# Allegro board T527-REF-LPDDR4-32X1-S4L-V1-0.brd
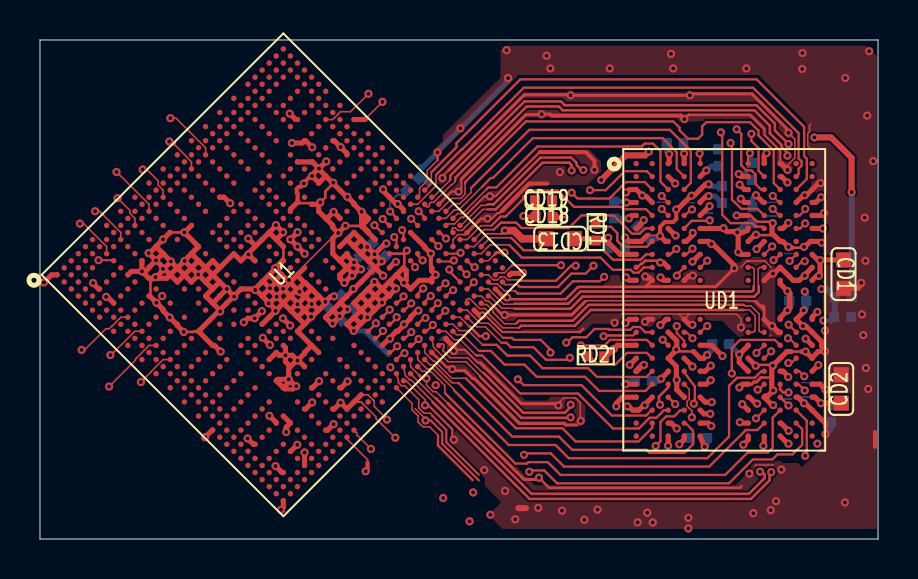
[diagram p0: board, top side]
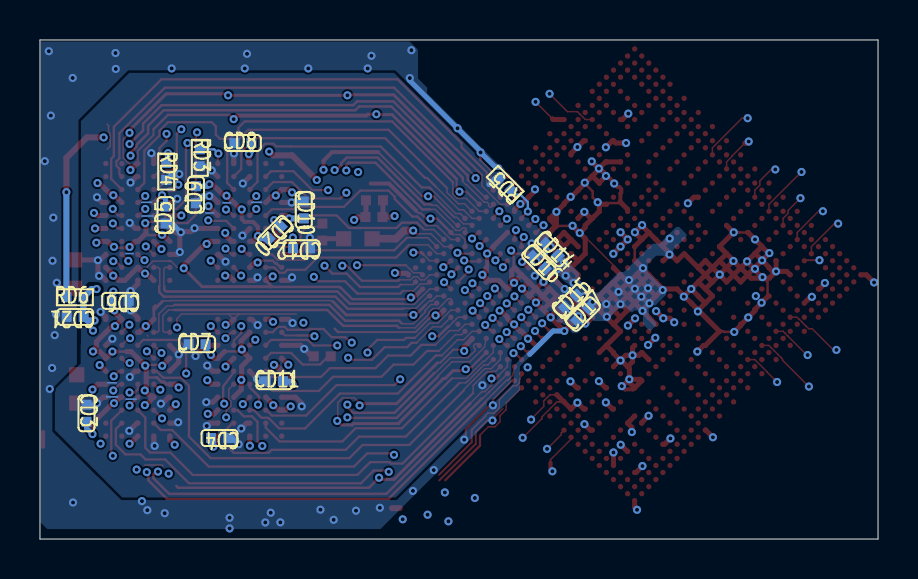
[diagram p1: board, bottom side, seen from below]

Outline 41.92 x 25 mm; copper layers: TOP, L2GND, L3, BOTTOM. Coordinates in mm from the lower left corner of the outline.
Outline path: 0,25 0,0 41.92,0 41.92,25 0,25

## Placement (name value [footprint] x y rotation side)
CD1  10uF  [C0603]  40.19 13.27 270 top
CD2  10uF  [C0603]  40.08 7.52 90 top
CD3  2.2uF  [C0402]  39.59 6.3 270 bottom
CD4  2.2uF  [C0402]  32.94 5.06 0 bottom
CD5  2.2uF  [C0402]  35.64 16.22 90 bottom
CD6  2.2uF  [C0402]  37.91 11.93 0 bottom
CD7  2.2uF  [C0402]  34.06 9.76 180 bottom
CD8  2.2uF  [C0402]  31.77 19.83 180 bottom
CD9  100nF  [C0402]  34.11 17.25 90 bottom
CD10  100nF  [C0402]  28.72 16.48 270 bottom
CD11  100nF  [C0402]  30.19 7.91 180 bottom
CD12  100nF  [C0402]  28.84 14.57 0 bottom
CD13  10uF  [C0603]  26.02 15.04 180 top
CD14  2.2uF  [C0402]  16.31 14.5 225 bottom
CD15  2.2uF  [C0402]  15.37 11.91 135 bottom
CD16  100nF  [C0402]  16.96 13.85 225 bottom
CD17  100nF  [C0402]  14.76 11.27 135 bottom
CD18  2.2uF  [C0402]  25.21 16.13 0 top
CD19  100nF  [C0402]  25.19 16.97 0 top
CD20  2.2uF  [C0402]  30.17 15.34 315 bottom
CD21  100nF  [C0402]  40.16 11.13 0 bottom
NOREF  -  []  0 25 0 top
NOREF#2  -  []  41.92 0 90 top
RD1  0R  [R0402]  27.8 15.38 270 top
RD2  0R  [R0402]  27.8 9.15 0 top
RD3  240R-1%  [R0402]  33.92 19.09 270 bottom
RD4  240R-1%  [R0402]  35.6 18.41 270 bottom
RD5  120R-1%  [R0402]  18.65 17.77 45 bottom
RD6  NC/0R  [R0402]  40.17 12.11 180 bottom
U1  T527  [BGA664P50B1700_1700H180]  12.17 13.23 45 top
UD1  LPDDR4_FBGA200  [BGA200P65_80B1000_1500H90]  34.22 11.98 0 top

## Library data of the parts
CD1-CD21 = C-C0402
RD1 RD2 = R-R0402-5%
RD3-RD6 = R-R0402-1%
U1 = T527/MR527-V1: signal model: BGA-15X15-V1_1_15X15_(S1+S2+S3+_BGA-15x15-V1_1
UD1 = LPDDR4_FBGA200

## Footprints (pads in the part's own frame, mm; a bottom-side part is the same pattern mirrored in y, then rotated)
BGA200P65_80B1000_1500H90
  round 0.27 smd: A1(-4.4,6.825) A2(-3.6,6.825) A3(-2.8,6.825) A4(-2,6.825) A5(-1.2,6.825) A8(1.2,6.825) A9(2,6.825) A10(2.8,6.825) A11(3.6,6.825) A12(4.4,6.825) AA1(-4.4,-6.175) AA2(-3.6,-6.175) AA3(-2.8,-6.175) AA4(-2,-6.175) AA5(-1.2,-6.175) AA8(1.2,-6.175) AA9(2,-6.175) AA10(2.8,-6.175) AA11(3.6,-6.175) AA12(4.4,-6.175) AB1(-4.4,-6.825) AB2(-3.6,-6.825) AB3(-2.8,-6.825) AB4(-2,-6.825) AB5(-1.2,-6.825) AB8(1.2,-6.825) AB9(2,-6.825) AB10(2.8,-6.825) AB11(3.6,-6.825) AB12(4.4,-6.825) B1(-4.4,6.175) B2(-3.6,6.175) B3(-2.8,6.175) B4(-2,6.175) B5(-1.2,6.175) B8(1.2,6.175) B9(2,6.175) B10(2.8,6.175) B11(3.6,6.175) B12(4.4,6.175) C1(-4.4,5.525) C2(-3.6,5.525) C3(-2.8,5.525) C4(-2,5.525) C5(-1.2,5.525) C8(1.2,5.525) C9(2,5.525) C10(2.8,5.525) C11(3.6,5.525) C12(4.4,5.525) D1(-4.4,4.875) D2(-3.6,4.875) D3(-2.8,4.875) D4(-2,4.875) D5(-1.2,4.875) D8(1.2,4.875) D9(2,4.875) D10(2.8,4.875) D11(3.6,4.875) D12(4.4,4.875) E1(-4.4,4.225) E2(-3.6,4.225) E3(-2.8,4.225) E4(-2,4.225) E5(-1.2,4.225) E8(1.2,4.225) E9(2,4.225) E10(2.8,4.225) E11(3.6,4.225) E12(4.4,4.225) F1(-4.4,3.575) F2(-3.6,3.575) F3(-2.8,3.575) F4(-2,3.575) F5(-1.2,3.575) F8(1.2,3.575) F9(2,3.575) F10(2.8,3.575) F11(3.6,3.575) F12(4.4,3.575) G1(-4.4,2.925) G2(-3.6,2.925) G3(-2.8,2.925) G4(-2,2.925) G5(-1.2,2.925) G8(1.2,2.925) G9(2,2.925) G10(2.8,2.925) G11(3.6,2.925) G12(4.4,2.925) H1(-4.4,2.275) H2(-3.6,2.275) H3(-2.8,2.275) H4(-2,2.275) H5(-1.2,2.275) H8(1.2,2.275) H9(2,2.275) H10(2.8,2.275) H11(3.6,2.275) H12(4.4,2.275) J1(-4.4,1.625) J2(-3.6,1.625) J3(-2.8,1.625) J4(-2,1.625) J5(-1.2,1.625) J8(1.2,1.625) J9(2,1.625) J10(2.8,1.625) J11(3.6,1.625) J12(4.4,1.625) K1(-4.4,0.975) K2(-3.6,0.975) K3(-2.8,0.975) K4(-2,0.975) K5(-1.2,0.975) K8(1.2,0.975) K9(2,0.975) K10(2.8,0.975) K11(3.6,0.975) K12(4.4,0.975) N1(-4.4,-0.975) N2(-3.6,-0.975) N3(-2.8,-0.975) N4(-2,-0.975) N5(-1.2,-0.975) N8(1.2,-0.975) N9(2,-0.975) N10(2.8,-0.975) N11(3.6,-0.975) N12(4.4,-0.975) P1(-4.4,-1.625) P2(-3.6,-1.625) P3(-2.8,-1.625) P4(-2,-1.625) P5(-1.2,-1.625) P8(1.2,-1.625) P9(2,-1.625) P10(2.8,-1.625) P11(3.6,-1.625) P12(4.4,-1.625) R1(-4.4,-2.275) R2(-3.6,-2.275) R3(-2.8,-2.275) R4(-2,-2.275) R5(-1.2,-2.275) R8(1.2,-2.275) R9(2,-2.275) R10(2.8,-2.275) R11(3.6,-2.275) R12(4.4,-2.275) T1(-4.4,-2.925) T2(-3.6,-2.925) T3(-2.8,-2.925) T4(-2,-2.925) T5(-1.2,-2.925) T8(1.2,-2.925) T9(2,-2.925) T10(2.8,-2.925) T11(3.6,-2.925) T12(4.4,-2.925) U1(-4.4,-3.575) U2(-3.6,-3.575) U3(-2.8,-3.575) U4(-2,-3.575) U5(-1.2,-3.575) U8(1.2,-3.575) U9(2,-3.575) U10(2.8,-3.575) U11(3.6,-3.575) U12(4.4,-3.575) V1(-4.4,-4.225) V2(-3.6,-4.225) V3(-2.8,-4.225) V4(-2,-4.225) V5(-1.2,-4.225) V8(1.2,-4.225) V9(2,-4.225) V10(2.8,-4.225) V11(3.6,-4.225) V12(4.4,-4.225) W1(-4.4,-4.875) W2(-3.6,-4.875) W3(-2.8,-4.875) W4(-2,-4.875) W5(-1.2,-4.875) W8(1.2,-4.875) W9(2,-4.875) W10(2.8,-4.875) W11(3.6,-4.875) W12(4.4,-4.875) Y1(-4.4,-5.525) Y2(-3.6,-5.525) Y3(-2.8,-5.525) Y4(-2,-5.525) Y5(-1.2,-5.525) Y8(1.2,-5.525) Y9(2,-5.525) Y10(2.8,-5.525) Y11(3.6,-5.525) Y12(4.4,-5.525)
BGA664P50B1700_1700H180
  round 0.27 smd: A1(-8,8) A2(-7.5,8) A3(-7,8) A4(-6.5,8) A5(-6,8) A6(-5.5,8) A8(-4.5,8) A10(-3.5,8) A12(-2.5,8) A14(-1.5,8) A16(-0.5,8) A18(0.5,8) A20(1.5,8) A22(2.5,8) A24(3.5,8) A26(4.5,8) A28(5.5,8) A29(6,8) A30(6.5,8) A31(7,8) A32(7.5,8) A33(8,8) AA1(-8,-2) AA2(-7.5,-2) AA3(-7,-2) AA4(-6.5,-2) AA5(-6,-2) AA6(-5.5,-2) AA7(-5,-2) AA9(-4,-2) AA12(-2.5,-2) AA13(-2,-2) AA15(-1,-2) AA16(-0.5,-2) AA18(0.5,-2) AA19(1,-2) AA21(2,-2) AA22(2.5,-2) AA24(3.5,-2) AA26(4.5,-2) AA27(5,-2) AA28(5.5,-2) AA29(6,-2) AA30(6.5,-2) AA31(7,-2) AA32(7.5,-2) AA33(8,-2) AB2(-7.5,-2.5) AB3(-7,-2.5) AB9(-4,-2.5) AB10(-3.5,-2.5) AB11(-3,-2.5) AB12(-2.5,-2.5) AB13(-2,-2.5) AB14(-1.5,-2.5) AB15(-1,-2.5) AB17(0,-2.5) AB24(3.5,-2.5) AB32(7.5,-2.5) AB33(8,-2.5) AC1(-8,-3) AC2(-7.5,-3) AC3(-7,-3) AC4(-6.5,-3) AC5(-6,-3) AC6(-5.5,-3) AC7(-5,-3) AC9(-4,-3) AC15(-1,-3) AC17(0,-3) AC18(0.5,-3) AC19(1,-3) AC20(1.5,-3) AC22(2.5,-3) AC24(3.5,-3) AC26(4.5,-3) AC27(5,-3) AC28(5.5,-3) AC29(6,-3) AC30(6.5,-3) AC31(7,-3) AC32(7.5,-3) AC33(8,-3) AD1(-8,-3.5) AD2(-7.5,-3.5) AD9(-4,-3.5) AD11(-3,-3.5) AD13(-2,-3.5) AD14(-1.5,-3.5) AD15(-1,-3.5) AD20(1.5,-3.5) AD21(2,-3.5) AD22(2.5,-3.5) AD25(4,-3.5) AD32(7.5,-3.5) AD33(8,-3.5) AE1(-8,-4) AE2(-7.5,-4) AE3(-7,-4) AE4(-6.5,-4) AE5(-6,-4) AE6(-5.5,-4) AE7(-5,-4) AE9(-4,-4) AE11(-3,-4) AE12(-2.5,-4) AE13(-2,-4) AE14(-1.5,-4) AE16(-0.5,-4) AE18(0.5,-4) AE19(1,-4) AE20(1.5,-4) AE21(2,-4) AE22(2.5,-4) AE23(3,-4) AE24(3.5,-4) AE25(4,-4) AE26(4.5,-4) AE27(5,-4) AE28(5.5,-4) AE29(6,-4) AE30(6.5,-4) AE31(7,-4) AE32(7.5,-4) AE33(8,-4) AF1(-8,-4.5) AF2(-7.5,-4.5) AF32(7.5,-4.5) AF33(8,-4.5) AG1(-8,-5) AG2(-7.5,-5) AG3(-7,-5) AG4(-6.5,-5) AG5(-6,-5) AG6(-5.5,-5) AG7(-5,-5) AG9(-4,-5) AG11(-3,-5) AG13(-2,-5) AG15(-1,-5) AG17(0,-5) AG19(1,-5) AG21(2,-5) AG23(3,-5) AG25(4,-5) AG28(5.5,-5) AG29(6,-5) AG30(6.5,-5) AG31(7,-5) AG32(7.5,-5) AG33(8,-5) AH1(-8,-5.5) AH2(-7.5,-5.5) AH7(-5,-5.5) AH9(-4,-5.5) AH11(-3,-5.5) AH13(-2,-5.5) AH15(-1,-5.5) AH17(0,-5.5) AH19(1,-5.5) AH21(2,-5.5) AH23(3,-5.5) AH25(4,-5.5) AH27(5,-5.5) AH32(7.5,-5.5) AH33(8,-5.5) AJ1(-8,-6) AJ2(-7.5,-6) AJ3(-7,-6) AJ4(-6.5,-6) AJ5(-6,-6) AJ7(-5,-6) AJ9(-4,-6) AJ11(-3,-6) AJ13(-2,-6) AJ15(-1,-6) AJ17(0,-6) AJ19(1,-6) AJ21(2,-6) AJ23(3,-6) AJ25(4,-6) AJ27(5,-6) AJ30(6.5,-6) AJ31(7,-6) AJ32(7.5,-6) AJ33(8,-6) AK1(-8,-6.5) AK2(-7.5,-6.5) AK5(-6,-6.5) AK7(-5,-6.5) AK9(-4,-6.5) AK11(-3,-6.5) AK13(-2,-6.5) AK15(-1,-6.5) AK17(0,-6.5) AK19(1,-6.5) AK21(2,-6.5) AK23(3,-6.5) AK25(4,-6.5) AK27(5,-6.5) AK29(6,-6.5) AK32(7.5,-6.5) AK33(8,-6.5) AL1(-8,-7) AL2(-7.5,-7) AL3(-7,-7) AL5(-6,-7) AL7(-5,-7) AL9(-4,-7) AL11(-3,-7) AL12(-2.5,-7) AL13(-2,-7) AL14(-1.5,-7) AL15(-1,-7) AL16(-0.5,-7) AL17(0,-7) AL19(1,-7) AL21(2,-7) AL23(3,-7) AL25(4,-7) AL27(5,-7) AL29(6,-7) AL31(7,-7) AL32(7.5,-7) AL33(8,-7) AM1(-8,-7.5) AM2(-7.5,-7.5) AM3(-7,-7.5) AM4(-6.5,-7.5) AM5(-6,-7.5) AM6(-5.5,-7.5) AM7(-5,-7.5) AM8(-4.5,-7.5) AM9(-4,-7.5) AM10(-3.5,-7.5) AM11(-3,-7.5) AM12(-2.5,-7.5) AM13(-2,-7.5) AM14(-1.5,-7.5) AM15(-1,-7.5) AM16(-0.5,-7.5) AM17(0,-7.5) AM18(0.5,-7.5) AM19(1,-7.5) AM20(1.5,-7.5) AM21(2,-7.5) AM22(2.5,-7.5) AM23(3,-7.5) AM24(3.5,-7.5) AM25(4,-7.5) AM26(4.5,-7.5) AM27(5,-7.5) AM28(5.5,-7.5) AM29(6,-7.5) AM30(6.5,-7.5) AM31(7,-7.5) AM32(7.5,-7.5) AM33(8,-7.5) AN1(-8,-8) AN2(-7.5,-8) AN3(-7,-8) AN4(-6.5,-8) AN5(-6,-8) AN6(-5.5,-8) AN7(-5,-8) AN8(-4.5,-8) AN9(-4,-8) AN10(-3.5,-8) AN11(-3,-8) AN13(-2,-8) AN15(-1,-8) AN17(0,-8) AN18(0.5,-8) AN19(1,-8) AN20(1.5,-8) AN21(2,-8) AN22(2.5,-8) AN23(3,-8) AN24(3.5,-8) AN25(4,-8) AN26(4.5,-8) AN27(5,-8) AN28(5.5,-8) AN29(6,-8) AN30(6.5,-8) AN31(7,-8) AN32(7.5,-8) AN33(8,-8) B1(-8,7.5) B2(-7.5,7.5) B3(-7,7.5) B4(-6.5,7.5) B5(-6,7.5) B6(-5.5,7.5) B7(-5,7.5) B8(-4.5,7.5) B9(-4,7.5) B10(-3.5,7.5) B11(-3,7.5) B12(-2.5,7.5) B13(-2,7.5) B14(-1.5,7.5) B15(-1,7.5) B16(-0.5,7.5) B17(0,7.5) B18(0.5,7.5) B19(1,7.5) B20(1.5,7.5) B21(2,7.5) B22(2.5,7.5) B23(3,7.5) B24(3.5,7.5) B25(4,7.5) B26(4.5,7.5) B27(5,7.5) B28(5.5,7.5) B29(6,7.5) B30(6.5,7.5) B31(7,7.5) B32(7.5,7.5) B33(8,7.5) C1(-8,7) C2(-7.5,7) C3(-7,7) C4(-6.5,7) C6(-5.5,7) C7(-5,7) C8(-4.5,7) C9(-4,7) C10(-3.5,7) C11(-3,7) C12(-2.5,7) C13(-2,7) C14(-1.5,7) C15(-1,7) C16(-0.5,7) C17(0,7) C18(0.5,7) C19(1,7) C20(1.5,7) C21(2,7) C22(2.5,7) C23(3,7) C24(3.5,7) C25(4,7) C26(4.5,7) C27(5,7) C28(5.5,7) C29(6,7) C30(6.5,7) C31(7,7) C32(7.5,7) C33(8,7) D1(-8,6.5) D2(-7.5,6.5) D6(-5.5,6.5) D8(-4.5,6.5) D10(-3.5,6.5) D12(-2.5,6.5) D14(-1.5,6.5) D16(-0.5,6.5) D18(0.5,6.5) D20(1.5,6.5) D22(2.5,6.5) D24(3.5,6.5) D26(4.5,6.5) D28(5.5,6.5) D32(7.5,6.5) D33(8,6.5) E1(-8,6) E2(-7.5,6) E3(-7,6) E4(-6.5,6) E5(-6,6) E6(-5.5,6) E8(-4.5,6) E10(-3.5,6) E12(-2.5,6) E14(-1.5,6) E16(-0.5,6) E18(0.5,6) E20(1.5,6) E22(2.5,6) E24(3.5,6) E26(4.5,6) E28(5.5,6) E29(6,6) E30(6.5,6) E31(7,6) E32(7.5,6) E33(8,6) F1(-8,5.5) F2(-7.5,5.5) F6(-5.5,5.5) F8(-4.5,5.5) F10(-3.5,5.5) F12(-2.5,5.5) F14(-1.5,5.5) F16(-0.5,5.5) F18(0.5,5.5) F20(1.5,5.5) F22(2.5,5.5) F24(3.5,5.5) F26(4.5,5.5) F28(5.5,5.5) F32(7.5,5.5) F33(8,5.5) G1(-8,5) G2(-7.5,5) G3(-7,5) G4(-6.5,5) G5(-6,5) G6(-5.5,5) G8(-4.5,5) G10(-3.5,5) G12(-2.5,5) G14(-1.5,5) G16(-0.5,5) G18(0.5,5) G20(1.5,5) G22(2.5,5) G24(3.5,5) G26(4.5,5) G28(5.5,5) G29(6,5) G30(6.5,5) G31(7,5) G32(7.5,5) G33(8,5) H2(-7.5,4.5) H3(-7,4.5) H24(3.5,4.5) H31(7,4.5) H32(7.5,4.5) J1(-8,4) J2(-7.5,4) J3(-7,4) J4(-6.5,4) J5(-6,4) J6(-5.5,4) J7(-5,4) J9(-4,4) J10(-3.5,4) J12(-2.5,4) J13(-2,4) J15(-1,4) J16(-0.5,4) J17(0,4) J18(0.5,4) J19(1,4) J21(2,4) J22(2.5,4) J23(3,4) J26(4.5,4) J28(5.5,4) J29(6,4) J30(6.5,4) J31(7,4) J32(7.5,4) J33(8,4) K2(-7.5,3.5) K3(-7,3.5) K9(-4,3.5) K10(-3.5,3.5) K11(-3,3.5) K12(-2.5,3.5) K13(-2,3.5) K15(-1,3.5) K16(-0.5,3.5) K19(1,3.5) K21(2,3.5) K22(2.5,3.5) K24(3.5,3.5) K25(4,3.5) K26(4.5,3.5) K31(7,3.5) K32(7.5,3.5) L1(-8,3) L2(-7.5,3) L3(-7,3) L4(-6.5,3) L5(-6,3) L6(-5.5,3) L7(-5,3) L9(-4,3) L10(-3.5,3) L12(-2.5,3) L13(-2,3) L15(-1,3) L16(-0.5,3) L17(0,3) L18(0.5,3) L19(1,3) L21(2,3) L22(2.5,3) L24(3.5,3) L26(4.5,3) L27(5,3) L28(5.5,3) L29(6,3) L30(6.5,3) L31(7,3) L32(7.5,3) L33(8,3) M2(-7.5,2.5) M3(-7,2.5) M10(-3.5,2.5) M13(-2,2.5) M16(-0.5,2.5) M18(0.5,2.5) M19(1,2.5) M21(2,2.5) M22(2.5,2.5) M31(7,2.5) M32(7.5,2.5) N1(-8,2) N2(-7.5,2) N3(-7,2) N4(-6.5,2) N5(-6,2) N6(-5.5,2) N7(-5,2) N9(-4,2) N10(-3.5,2) N12(-2.5,2) N13(-2,2) N15(-1,2) N18(0.5,2) N19(1,2) N21(2,2) N22(2.5,2) N24(3.5,2) N26(4.5,2) N27(5,2) N28(5.5,2) N29(6,2) N30(6.5,2) N31(7,2) N32(7.5,2) N33(8,2) P2(-7.5,1.5) P3(-7,1.5) P9(-4,1.5) P11(-3,1.5) P13(-2,1.5) P16(-0.5,1.5) P18(0.5,1.5) P19(1,1.5) P21(2,1.5) P22(2.5,1.5) P24(3.5,1.5) P31(7,1.5) P32(7.5,1.5) R1(-8,1) R2(-7.5,1) R3(-7,1) R4(-6.5,1) R5(-6,1) R6(-5.5,1) R7(-5,1) R11(-3,1) R13(-2,1) R15(-1,1) R17(0,1) R18(0.5,1) R19(1,1) R22(2.5,1) R24(3.5,1) R26(4.5,1) R27(5,1) R28(5.5,1) R29(6,1) R30(6.5,1) R31(7,1) R32(7.5,1) R33(8,1) T2(-7.5,0.5) T3(-7,0.5) T9(-4,0.5) T11(-3,0.5) T13(-2,0.5) T15(-1,0.5) T16(-0.5,0.5) T18(0.5,0.5) T19(1,0.5) T21(2,0.5) T22(2.5,0.5) T24(3.5,0.5) T31(7,0.5) T32(7.5,0.5) U1(-8,0) U2(-7.5,0) U3(-7,0) U4(-6.5,0) U5(-6,0) U6(-5.5,0) U7(-5,0) U8(-4.5,0) U10(-3.5,0) U12(-2.5,0) U13(-2,0) U14(-1.5,0) U16(-0.5,0) U18(0.5,0) U19(1,0) U21(2,0) U22(2.5,0) U25(4,0) U26(4.5,0) U27(5,0) U28(5.5,0) U29(6,0) U30(6.5,0) U31(7,0) U32(7.5,0) U33(8,0) V2(-7.5,-0.5) V3(-7,-0.5) V18(0.5,-0.5) V19(1,-0.5) V31(7,-0.5) V32(7.5,-0.5) W1(-8,-1) W2(-7.5,-1) W3(-7,-1) W4(-6.5,-1) W5(-6,-1) W6(-5.5,-1) W7(-5,-1) W9(-4,-1) W10(-3.5,-1) W12(-2.5,-1) W13(-2,-1) W15(-1,-1) W16(-0.5,-1) W19(1,-1) W21(2,-1) W22(2.5,-1) W23(3,-1) W24(3.5,-1) W25(4,-1) W27(5,-1) W28(5.5,-1) W29(6,-1) W30(6.5,-1) W31(7,-1) W32(7.5,-1) W33(8,-1) Y2(-7.5,-1.5) Y3(-7,-1.5) Y9(-4,-1.5) Y10(-3.5,-1.5) Y12(-2.5,-1.5) Y13(-2,-1.5) Y15(-1,-1.5) Y18(0.5,-1.5) Y19(1,-1.5) Y21(2,-1.5) Y22(2.5,-1.5) Y23(3,-1.5) Y24(3.5,-1.5) Y26(4.5,-1.5) Y31(7,-1.5) Y32(7.5,-1.5)
C0402
  rect 0.5x0.5 smd: 1(-0.425,0) 2(0.425,0)
C0603
  rect 0.76x0.76 smd: 1(-0.71,0) 2(0.71,0)
R0402
  rect 0.5x0.5 smd: 1(-0.425,0) 2(0.425,0)

## Nets
GND: CD1.2 CD2.2 CD3.2 CD4.2 CD5.2 CD6.2 CD7.2 CD8.2 CD9.2 CD10.2 CD11.2 CD12.2 CD13.2 CD14.2 CD15.2 CD16.2 CD17.2 CD18.2 CD19.2 CD20.2 CD21.2 U1.A1(GND0) U1.AA15(GND87) U1.AA16(GND88) U1.AA18(GND89) U1.AA21(GND90) U1.AA22(GND91) U1.AA26(GND92) U1.AA30(GND93) U1.AA32(GND94) U1.AB10(GND95) U1.AB11(GND96) U1.AB12(GND97) U1.AB14(GND98) U1.AB15(GND99) U1.AB17(GND100) U1.AC1(GND101) U1.AC26(GND102) U1.AC29(GND103) U1.AC33(GND104) U1.AD9(GND105) U1.AD11(GND106) U1.AD13(GND107) U1.AD14(GND108) U1.AD20(GND109) U1.AD21(GND110) U1.AD22(GND111) U1.AE9(GND112) U1.AE12(GND113) U1.AE14(GND114) U1.AE18(GND115) U1.AE19(GND116) U1.AE20(GND117) U1.AE21(GND118) U1.AE22(GND119) U1.AE23(GND120) U1.AE24(GND121) U1.AE25(GND122) U1.AE26(GND123) U1.AE29(GND124) U1.AE32(GND125) U1.AG3(GND126) U1.AG6(GND127) U1.AG7(GND128) U1.AG11(GND129) U1.AG25(GND130) U1.AG28(GND131) U1.AG31(GND132) U1.AG33(GND133) U1.AH7(GND134) U1.AH9(GND135) U1.AH27(GND136) U1.AH32(GND137) U1.AJ13(GND138) U1.AJ19(GND139) U1.AJ21(GND140) U1.AJ23(GND141) U1.AK5(GND142) U1.AK11(GND143) U1.AK32(GND144) U1.AL3(GND145) U1.AL9(GND146) U1.AL12(GND147) U1.AL13(GND148) U1.AL14(GND149) U1.AM5(GND150) U1.AM20(GND151) U1.AM26(GND152) U1.AM29(GND153) U1.AN1(GND154) U1.AN10(GND155) U1.AN11(GND156) U1.AN18(GND157) U1.AN22(GND158) U1.AN24(GND159) U1.AN28(GND160) U1.AN31(GND161) U1.AN33(GND162) U1.C6(GND1) U1.C8(GND2) U1.C10(GND3) U1.C12(GND4) U1.C14(GND5) U1.C18(GND6) U1.C20(GND7) U1.D6(GND8) U1.E3(GND9) U1.F6(GND10) U1.F8(GND11) U1.F10(GND12) U1.F12(GND13) U1.G3(GND14) U1.G8(GND15) U1.G10(GND16) U1.G14(GND17) U1.G18(GND18) U1.G29(GND19) U1.J3(GND20) U1.J6(GND21) U1.J9(GND22) U1.J10(GND23) U1.J12(GND24) U1.J13(GND25) U1.J28(GND26) U1.J31(GND27) U1.K9(GND28) U1.K10(GND29) U1.K11(GND30) U1.K12(GND31) U1.K26(GND32) U1.L3(GND33) U1.L6(GND34) U1.L10(GND35) U1.L12(GND36) U1.L13(GND37) U1.L27(GND38) U1.L30(GND39) U1.L33(GND40) U1.M13(GND41) U1.N3(GND42) U1.N6(GND43) U1.N10(GND44) U1.N12(GND45) U1.N15(GND46) U1.N18(GND47) U1.N19(GND48) U1.N22(GND49) U1.N26(GND50) U1.N27(GND51) U1.N30(GND52) U1.P11(GND53) U1.P16(GND54) U1.P19(GND55) U1.P24(GND56) U1.R3(GND57) U1.R7(GND58) U1.R11(GND59) U1.R13(GND60) U1.R19(GND61) U1.R24(GND62) U1.R27(GND63) U1.T15(GND64) U1.T16(GND65) U1.T18(GND66) U1.T24(GND67) U1.U7(GND68) U1.U14(GND69) U1.U16(GND70) U1.U25(GND71) U1.U27(GND72) U1.V18(GND73) U1.V19(GND74) U1.W12(GND75) U1.W13(GND76) U1.W15(GND77) U1.W16(GND78) U1.W22(GND79) U1.W27(GND80) U1.W30(GND81) U1.Y15(GND82) U1.Y18(GND83) U1.Y22(GND84) U1.Y23(GND85) U1.Y26(GND86) UD1.A3(VSS0) UD1.A10(VSS1) UD1.AB3(VSS54) UD1.AB5(VSS55) UD1.AB8(VSS56) UD1.AB10(VSS57) UD1.C1(VSS2) UD1.C5(VSS3) UD1.C8(VSS4) UD1.C12(VSS5) UD1.D2(VSS6) UD1.D4(VSS7) UD1.D9(VSS8) UD1.D11(VSS9) UD1.E1(VSS10) UD1.E5(VSS11) UD1.E8(VSS12) UD1.E12(VSS13) UD1.G1(VSS14) UD1.G3(VSS15) UD1.G5(VSS16) UD1.G8(VSS17) UD1.G10(VSS18) UD1.G12(VSS19) UD1.J1(VSS20) UD1.J3(VSS21) UD1.J10(VSS22) UD1.J12(VSS23) UD1.K2(VSS24) UD1.K4(VSS25) UD1.K9(VSS26) UD1.K11(VSS27) UD1.N2(VSS28) UD1.N4(VSS29) UD1.N9(VSS30) UD1.N11(VSS31) UD1.P1(VSS32) UD1.P3(VSS33) UD1.P10(VSS34) UD1.P12(VSS35) UD1.T1(VSS36) UD1.T3(VSS37) UD1.T5(VSS38) UD1.T8(VSS39) UD1.T10(VSS40) UD1.T12(VSS41) UD1.V1(VSS42) UD1.V5(VSS43) UD1.V8(VSS44) UD1.V12(VSS45) UD1.W2(VSS46) UD1.W4(VSS47) UD1.W9(VSS48) UD1.W11(VSS49) UD1.Y1(VSS50) UD1.Y5(VSS51) UD1.Y8(VSS52) UD1.Y12(VSS53)
VCC-DRAM: CD1.1 CD2.1 CD3.1 CD4.1 CD5.1 CD6.1 CD7.1 CD8.1 CD9.1 CD10.1 CD11.1 CD12.1 CD13.1 CD14.1 CD15.1 CD16.1 CD17.1 RD1.2 RD2.2 RD3.2 RD4.2 RD5.2 U1.AA24(VCC-DRAM4) U1.AB24(VCC-DRAM5) U1.AC17(VCC-DRAML0) U1.AC18(VCC-DRAML1) U1.AC19(VCC-DRAML2) U1.AC20(VCC-DRAML3) U1.AC22(VCC-DRAML4) U1.AC24(VCC-DRAM6) U1.W23(VCC-DRAM0) U1.W24(VCC-DRAM1) U1.W25(VCC-DRAM2) U1.Y24(VCC-DRAM3) UD1.A4(VDD2-0) UD1.A9(VDD2-1) UD1.AA3(VDDQ-16) UD1.AA5(VDDQ-17) UD1.AA8(VDDQ-18) UD1.AA10(VDDQ-19) UD1.AB4(VDD2-22) UD1.AB9(VDD2-23) UD1.B3(VDDQ-0) UD1.B5(VDDQ-1) UD1.B8(VDDQ-2) UD1.B10(VDDQ-3) UD1.D1(VDDQ-4) UD1.D5(VDDQ-5) UD1.D8(VDDQ-6) UD1.D12(VDDQ-7) UD1.F3(VDDQ-8) UD1.F5(VDD2-2) UD1.F8(VDD2-3) UD1.F10(VDDQ-9) UD1.H1(VDD2-4) UD1.H5(VDD2-5) UD1.H8(VDD2-6) UD1.H12(VDD2-7) UD1.K1(VDD2-8) UD1.K3(VDD2-9) UD1.K10(VDD2-10) UD1.K12(VDD2-11) UD1.N1(VDD2-12) UD1.N3(VDD2-13) UD1.N10(VDD2-14) UD1.N12(VDD2-15) UD1.R1(VDD2-16) UD1.R5(VDD2-17) UD1.R8(VDD2-18) UD1.R12(VDD2-19) UD1.U3(VDDQ-10) UD1.U5(VDD2-20) UD1.U8(VDD2-21) UD1.U10(VDDQ-11) UD1.W1(VDDQ-12) UD1.W5(VDDQ-13) UD1.W8(VDDQ-14) UD1.W12(VDDQ-15)
VDD18-DRAM: CD18.1 CD19.1 RD6.1 U1.AD25(VDD18-DRAM)
VDD18-LPDDR: CD20.1 CD21.1 RD6.2 UD1.F1(VDD1-0) UD1.F12(VDD1-1) UD1.G4(VDD1-2) UD1.G9(VDD1-3) UD1.T4(VDD1-4) UD1.T9(VDD1-5) UD1.U1(VDD1-6) UD1.U12(VDD1-7)
SAA0: U1.AJ33(SA2) UD1.H2(CA0_A)
SAA1: U1.AJ32(SA11) UD1.J2(CA1_A)
SAA2: U1.AG30(SA1) UD1.H9(CA2_A)
SAA3: U1.AG29(SA10) UD1.H10(CA3_A)
SAA4: U1.AJ30(SA17) UD1.H11(CA4_A)
SAA5: U1.AJ31(SA9) UD1.J11(CA5_A)
SAB0: U1.AJ25(SBA1) UD1.R2(CA0_B)
SAB1: U1.AH25(SA4) UD1.P2(CA1_B)
SAB2: U1.AL25(SA8) UD1.R9(CA2_B)
SAB3: U1.AK25(SBA0) UD1.R10(CA3_B)
SAB4: U1.AJ27(SA16) UD1.R11(CA4_B)
SAB5: U1.AL29(SACT) UD1.P11(CA5_B)
SCKE0-A: U1.AM31(SCKE0) UD1.J4(CKE0_A)
SCKE0-B: U1.AN27(SA6) UD1.P4(CKE0_B)
SCKE1-A: U1.AL31(SA12) UD1.J5(CKE1_A)
SCKE1-B: U1.AM27(SBG1) UD1.P5(CKE1_B)
SCKN-A: U1.AN30(SCKN) UD1.J9(CK_C_A)
SCKN-B: U1.AN29(SA15) UD1.P9(CK_C_B)
SCKP-A: U1.AM30(SCKP) UD1.J8(CK_T_A)
SCKP-B: U1.AM28(SA14) UD1.P8(CK_T_B)
SCS0-A: U1.AN32(SCS0) UD1.H4(CS0_A)
SCS0-B: U1.AK29(SA13) UD1.R4(CS0_B)
SCS1-A: U1.AM32(SCS1) UD1.H3(CS1_A)
SCS1-B: U1.AK27(SA5) UD1.R3(CS1_B)
SDQ0: U1.AE28(SDQ0) UD1.E4(DQ5_A)
SDQ1: U1.AE27(SDQ1) UD1.F4(DQ4_A)
SDQ2: U1.AG32(SDQ2) UD1.E2(DQ2_A)
SDQ3: U1.AH33(SDQ3) UD1.F2(DQ3_A)
SDQ4: U1.AE30(SDQ4) UD1.B2(DQ0_A)
SDQ5: U1.AD32(SDQ5) UD1.B4(DQ7_A)
SDQ6: U1.AE31(SDQ6) UD1.C2(DQ1_A)
SDQ7: U1.AD33(SDQ7) UD1.C4(DQ6_A)
SDQ8: U1.AC27(SDQ8) UD1.E9(DQ13_A)
SDQ9: U1.AC28(SDQ9) UD1.F9(DQ12_A)
SDQ10: U1.AC30(SDQ10) UD1.B9(DQ15_A)
SDQ11: U1.AC31(SDQ11) UD1.C9(DQ14_A)
SDQ12: U1.AA33(SDQ12) UD1.C11(DQ9_A)
SDQ13: U1.AA31(SDQ13) UD1.B11(DQ8_A)
SDQ14: U1.AA28(SDQ14) UD1.F11(DQ11_A)
SDQ15: U1.AA27(SDQ15) UD1.E11(DQ10_A)
SDQ16: U1.AM25(SDQ16) UD1.U2(DQ3_B)
SDQ17: U1.AN25(SDQ17) UD1.V2(DQ2_B)
SDQ18: U1.AH23(SDQ18) UD1.U4(DQ4_B)
SDQ19: U1.AK23(SDQ19) UD1.Y2(DQ1_B)
SDQ20: U1.AL23(SDQ20) UD1.V4(DQ5_B)
SDQ21: U1.AM22(SDQ21) UD1.AA2(DQ0_B)
SDQ22: U1.AN21(SDQ22) UD1.AA4(DQ7_B)
SDQ23: U1.AG21(SDQ23) UD1.Y4(DQ6_B)
SDQ24: U1.AG19(SDQ24) UD1.AA9(DQ15_B)
SDQ25: U1.AH19(SDQ25) UD1.AA11(DQ8_B)
SDQ26: U1.AK19(SDQ26) UD1.V11(DQ10_B)
SDQ27: U1.AL19(SDQ27) UD1.Y11(DQ9_B)
SDQ28: U1.AM21(SDQ28) UD1.U9(DQ12_B)
SDQ29: U1.AL21(SDQ29) UD1.U11(DQ11_B)
SDQ30: U1.AK21(SDQ30) UD1.Y9(DQ14_B)
SDQ31: U1.AH21(SDQ31) UD1.V9(DQ13_B)
SDQM0: U1.AE33(SDQM0) UD1.C3(DM0_A)
SDQM1: U1.AC32(SDQM1) UD1.C10(DM1_A)
SDQM2: U1.AM24(SDQM2) UD1.Y3(DM0_B)
SDQM3: U1.AN20(SDQM3) UD1.Y10(DM1_B)
SDQS0N: U1.AF33(SDQS0N) UD1.E3(DQS0N_A)
SDQS0P: U1.AF32(SDQS0P) UD1.D3(DQS0P_A)
SDQS1N: U1.AB33(SDQS1N) UD1.E10(DQS1N_A)
SDQS1P: U1.AB32(SDQS1P) UD1.D10(DQS1P_A)
SDQS2N: U1.AN23(SDQS2N) UD1.V3(DQS0N_B)
SDQS2P: U1.AM23(SDQS2P) UD1.W3(DQS0P_B)
SDQS3N: U1.AN19(SDQS3N) UD1.V10(DQS1N_B)
SDQS3P: U1.AM19(SDQS3P) UD1.W10(DQS1P_B)
SRST: U1.AG23(SRST) UD1.T11(RESET-N)
N16531011: RD5.1 U1.AA29(SZQ)
N16533680: RD3.1 UD1.A5(ZQ0)
N16533684: RD4.1 UD1.A8(ZQ1)
N16533962: RD2.1 UD1.T2(ODT_CA_B)
N16533966: RD1.1 UD1.G2(ODT_CA_A)

Pads without a net: U1 A2 A3 A4 A5 A6 A8 A10 A12 A14 A16 A18 A20 A22 A24 A26 A28 A29 A30 A31 A32 A33 AA1 AA2 AA3 AA4 AA5 AA6 AA7 AA9 AA12 AA13 AA19 AB2 AB3 AB9 AB13 AC2 AC3 AC4 AC5 AC6 AC7 AC9 AC15 AD1 AD2 AD15 AE1 AE2 AE3 AE4 AE5 AE6 AE7 AE11 AE13 AE16 AF1 AF2 AG1 AG2 AG4 AG5 AG9 AG13 AG15 AG17 AH1 AH2 AH11 AH13 AH15 AH17 AJ1 AJ2 AJ3 AJ4 AJ5 AJ7 AJ9 AJ11 AJ15 AJ17 AK1 AK2 AK7 AK9 AK13 AK15 AK17 AK33 AL1 AL2 AL5 AL7 AL11 AL15 AL16 AL17 AL27 AL32 AL33 AM1 AM2 AM3 AM4 AM6 AM7 AM8 AM9 AM10 AM11 AM12 AM13 AM14 AM15 AM16 AM17 AM18 AM33 AN2 AN3 AN4 AN5 AN6 AN7 AN8 AN9 AN13 AN15 AN17 AN26 B1 B2 B3 B4 B5 B6 B7 B8 B9 B10 B11 B12 B13 B14 B15 B16 B17 B18 B19 B20 B21 B22 B23 B24 B25 B26 B27 B28 B29 B30 B31 B32 B33 C1 C2 C3 C4 C7 C9 C11 C13 C15 C16 C17 C19 C21 C22 C23 C24 C25 C26 C27 C28 C29 C30 C31 C32 C33 D1 D2 D8 D10 D12 D14 D16 D18 D20 D22 D24 D26 D28 D32 D33 E1 E2 E4 E5 E6 E8 E10 E12 E14 E16 E18 E20 E22 E24 E26 E28 E29 E30 E31 E32 E33 F1 F2 F14 F16 F18 F20 F22 F24 F26 F28 F32 F33 G1 G2 G4 G5 G6 G12 G16 G20 G22 G24 G26 G28 G30 G31 G32 G33 H2 H3 H24 H31 H32 J1 J2 J4 J5 J7 J15 J16 J17 J18 J19 J21 J22 J23 J26 J29 J30 J32 J33 K2 K3 K13 K15 K16 K19 K21 K22 K24 K25 K31 K32 L1 L2 L4 L5 L7 L9 L15 L16 L17 L18 L19 L21 L22 L24 L26 L28 L29 L31 L32 M2 M3 M10 M16 M18 M19 M21 M22 M31 M32 N1 N2 N4 N5 N7 N9 N13 N21 N24 N28 N29 N31 N32 N33 P2 P3 P9 P13 P18 P21 P22 P31 P32 R1 R2 R4 R5 R6 R15 R17 R18 R22 R26 R28 R29 R30 R31 R32 R33 T2 T3 T9 T11 T13 T19 T21 T22 T31 T32 U1 U2 U3 U4 U5 U6 U8 U10 U12 U13 U18 U19 U21 U22 U26 U28 U29 U30 U31 U32 U33 V2 V3 V31 V32 W1 W2 W3 W4 W5 W6 W7 W9 W10 W19 W21 W28 W29 W31 W32 W33 Y2 Y3 Y9 Y10 Y12 Y13 Y19 Y21 Y31 Y32; UD1 A1 A2 A11 A12 AA1 AA12 AB1 AB2 AB11 AB12 B1 B12 G11 K5 K8 N5 N8

## Via types
v1: diameter 0.406, hole 0.203, TOP to BOTTOM, 425 vias

## Routing (per net, layer and track width the routed paths; a pad name or vN(x,y) marks a point on that pad's centre or on a via; arc(x,y) is an arc through that point)
GND: length 464.8
  TOP w0.076: U1.C12 5.45,16.77 4.06,18.16 4.05,18.16 v1(3.83,18.38) ; 35.76,3.66 35.81,3.71 36.68,3.71 ; v1(2.76,16.42) 2.97,16.42 4.04,15.35 U1.C8 ; U1.C18 7.58,18.89 7.29,19.17 7.29,19.19 6.66,19.82 ; U1.AL14 16.42,7.22 16.52,7.12 16.72,6.92 16.72,6.64 17.35,6.01 v1(17.35,5.98) ; 19.85,19.23 19.85,19.38 19.87,19.38 v1(19.88,19.37) ; 16.28,21.05 v1(17.13,21.9) ; 23.09,15.29 22.36,15.29 21.72,14.65 U1.AH32 ; 32.49,11.27 31.96,11.27 ; 32.49,11.27 UD1.N4 31.96,11.27 ; 32.49,11.27 34.84,11.27 35.06,11.04 v1(35.06,10.6) ; 31.96,11.27 29.1,11.27 ; U1.R3 6.16,8.99 5.56,8.39 5.56,8.37 v1(5.05,7.86) ; v1(16.43,22.3) 15.53,21.4 15.03,21.4 14.9,21.27 14.9,21.26 14.75,21.11 14.74,21.11 14.64,21.01 U1.J31 ; 21.18,16.11 21.06,16.11 20.73,15.78 20.38,15.78 U1.AE32 ; 14.65,15.06 14.57,15.06 13.23,13.72 U1.V19 ; 20.4,6.8 19.81,7.38 19.66,7.38 19.33,7.71 v1(19.33,8.04) ; 18.97,8.2 18.54,8.64 U1.AM20 ; 20.46,18.48 20.13,18.15 v1(20.13,18.08) ; 20.66,14.65 20.66,15 20.91,15.25 21.26,15.25 U1.AG33 ; 27.3,11.93 27.35,11.93 27.37,11.94 35.38,11.94 35.4,11.93 35.77,11.93 ; 38.56,19.52 38.4,19.67 38.4,20.3 38.49,20.39 38.49,20.71 38.56,20.78 ; 26.02,6.69 v1(25.93,6.69) ; 19.89,18.98 19.37,18.46 19.37,17.96 18.99,17.57 18.99,17.22 U1.AA32 ; 25.91,6.78 26.2,7.07 26.78,7.07 27.02,6.83 27.02,5.95 v1(27.05,5.92) ; v1(37.44,20.34) 37.76,20.03 37.76,19.09 37.4,18.73 v1(37.4,18.48) ; U1.C10 4.75,16.06 4.5,16.31 4.5,16.46 v1(3.88,17.07) ; 22.62,11.73 22.43,11.92 22.32,11.92 22.32,11.92 22.07,12.17 U1.AM29 ; U1.J3 4.05,11.11 3.95,11.01 3.94,11.01 3.79,10.86 3.79,10.85 3.6,10.65 3.58,10.65 3.46,10.53 3.29,10.53 2.23,9.47 v1(2.08,9.47) ; v1(6.52,21.08) 6.8,21.08 8.28,19.6 U1.C20 ; v1(19.29,5.94) 19.29,6.01 18.76,6.53 ; U1.AK32 22.43,13.94 22.75,14.26 ; v1(3.52,9.22) 3.55,9.22 4.49,10.15 4.5,10.15 4.64,10.3 4.64,10.31 4.74,10.4 U1.L3 ; 35.37,13.92 35.36,13.92 35.05,13.61 ; v1(3.46,7.64) 4.78,8.96 4.78,9.02 4.85,9.09 5.21,9.45 5.35,9.59 5.35,9.59 5.46,9.7 U1.N3 ; 36.52,10.16 36.56,10.2 ; v1(5.14,18.51) 5.34,18.51 5.91,17.94 5.91,17.73 6.16,17.48 6.16,17.12 U1.C14 ; 21.48,10.64 21.26,10.86 21.26,10.86 21.11,11.01 21.11,11.01 21.01,11.11 U1.AM26 ; U1.AN18 18.31,7.93 19.26,6.98 v1(19.26,6.7) ; 17.77,5.07 16.81,6.04 16.81,6.12 16.16,6.76 16.06,6.87 15.96,6.87 ; 30.38,15.21 30.98,15.21 v1(31.02,15.18) ; 35.49,13.92 36.26,13.92 36.55,13.64 36.55,13.61 ; U1.C6 3.33,14.65 2.2,15.78 2.01,15.78 v1(1.99,15.8) ; 16.38,3.83 16.38,3.98 15.35,5.01 U1.AN10 ; U1.AN11 15.84,5.32 15.84,5.23 v1(16.55,4.52)
  TOP w0.102: v1(19.29,5.94) 19.54,5.94 20.12,5.36 20.12,4.77 21.95,2.94 ; 21.18,16.11 22.23,17.16 22.5,17.16 v1(22.5,17.17) 22.79,17.17 25,19.38 ; v1(22.39,16.05) 22.6,16.05 22.87,16.32 22.94,16.32 22.96,16.34 23,16.34 23.1,16.44 ; 22.04,8.81 22.02,8.84 21.89,8.84 21.24,9.49 20.6,9.49 ; v1(2.93,13.97) 3.66,13.97 U1.D6 ; v1(19.26,6.7) 19.42,6.7 20.45,5.67 20.45,5.67 20.62,5.5 20.62,5.05 v1(20.7,4.98) ; 29.03,10.2 29.67,10.2 UD1.P1 ; U1.AC33 20.59,17.41 20.93,17.41 v1(20.94,17.4) 21.08,17.54 21.08,18.03 ; 27.26,11.89 27.3,11.93 ; 36.24,20.52 36.24,20.23 37.02,19.45 UD1.A10 ; 26.96,10.37 23.13,10.37 22.47,11.02 22.46,11.03 22.3,11.19 22.3,11.2 v1(22.13,11.2) ; 5.48,14.32 U1.F10 ; U1.AL13 15.96,6.87 ; 35.77,11.93 35.81,11.89 ; 13.56,6.84 v1(13.61,6.84) ; 35.49,13.92 35.37,13.92
  TOP w0.114: 17.77,5.07 v1(17.77,5.07) ; U1.AN22 20.33,8.61 20.52,8.61 v1(20.62,8.51)
  TOP w0.127: 27.17,10.53 27.01,10.37 26.96,10.37 ; 36.71,15.22 35.83,15.22 v1(35.81,15.24) ; v1(35.8,8.68) 35.85,8.72 36.62,8.72 v1(36.65,8.69) ; 18.22,14.32 v1(18.35,14.45) ; 18.22,14.32 18.22,13.63 U1.AE26 ; 18.22,14.32 18.19,14.29 17.48,14.29 ; v1(22.39,16.05) 22.06,16.05 U1.AG33 ; 36.11,8.09 36.58,8.09 36.6,8.11 ; 38.22,14.59 37.62,14.59 ; U1.J6 5.53,12.24 5.53,12.86 v1(5.78,13.12) ; 12.91,16.9 12.98,16.82 13.53,16.82 U1.P24 ; v1(7.22,15.36) 6.95,15.36 6.94,15.35 6.52,15.35 U1.F12 ; 16.09,15.68 15.28,15.68 v1(15.28,15.69) ; 36.14,11.7 36.22,11.62 UD1.N9 ; 32.68,9.4 31.92,9.4 v1(31.82,9.49) ; U1.T18 U1.R19 ; v1(19.88,19.37) 19.84,19.33 19.89,19.28 19.89,18.98 ; v1(14.02,16.87) 14.03,16.87 14.04,16.87 14.27,17.11 14.27,17.41 14.67,17.81 ; 30.43,12.65 30.41,12.63 26.94,12.63 26.91,12.6 26.88,12.6 26.3,12.01 23.45,12.01 v1(23.37,12.1) ; 35.1,2.65 35.01,2.57 25.46,2.57 v1(24.96,3.07) ; v1(7.19,10.37) 7.7,10.37 7.73,10.4 7.93,10.4 ; v1(36.65,15.82) 36.6,15.82 36.53,15.89 35.86,15.89 35.55,16.21 UD1.E8 ; v1(28.19,10.16) 28.23,10.2 29.03,10.2 ; 22.62,11.73 23.13,11.23 v1(23.24,11.23) ; v1(22.3,10.16) 21.99,10.16 21.51,10.64 21.48,10.64 ; 23.09,15.29 v1(23.25,15.45) ; v1(31.03,13.85) 30.93,13.94 30.28,13.94 30.12,13.79 30.07,13.79 29.89,13.61 UD1.J1 ; v1(32.23,21.03) 32.45,21.25 35.52,21.25 36.24,20.52 ; 37.59,9.39 38.11,9.39
  TOP w0.152: UD1.V8 35.59,7.76 35.71,7.87 35.84,7.87 36.06,8.09 36.11,8.09 ; 18.97,8.2 19.13,8.04 v1(19.33,8.04) ; v1(20.62,8.51) 20.69,8.44 21.25,8.44 21.65,8.04 21.74,8.04 23.99,5.78 26.23,5.78 26.3,5.71 26.85,5.71 ; v1(37.44,20.34) 37.44,20.47 35.61,22.3 32.59,22.3 v1(32.51,22.22) v1(26.54,22.22) 26.44,22.22 26.41,22.25 24.23,22.25 20.46,18.48 ; 35.81,11.89 36.22,11.48 ; 22.04,8.81 24.08,6.78 25.91,6.78 ; v1(23.24,11.23) 26.6,11.23 27.26,11.89 ; v1(23.24,14.35) 22.84,14.35 22.75,14.26 ; 20.4,6.8 24.21,2.99 24.82,2.99 24.9,3.07 v1(24.96,3.07) ; 25.59,21.21 25.52,21.28 v1(25.09,21.28) 25.07,21.26 24.31,21.26 21.08,18.03 ; v1(34.73,13.56) 33.8,12.64 30.31,12.64 UD1.K2
  TOP w0.203: 13.52,18.17 13.2,17.85 v1(13.2,17.81) 13.03,17.64 12.94,17.64 12.84,17.54 12.84,17.35 12.89,17.3 12.89,16.92 12.91,16.9 ; 41.76,4.62 41.76,5.35 41.76,5.36 ; 25.37,17.8 24.47,17.8 23.1,16.44 ; v1(32.23,21.03) 32.05,21.21 25.59,21.21 ; v1(12.82,7.66) 12.66,7.5 12.25,7.5 U1.AE9 ; 25,19.38 27.3,19.38 27.73,18.95 v1(27.73,18.49) ; U1.AN31 23.2,12.1 v1(23.37,12.1) ; v1(19.55,14.3) 19.55,13.63 U1.AG28 ; v1(31.02,15.18) 31.02,15.64 31.26,15.88 31.68,15.88 31.83,16.03 v1(31.83,16.51) ; v1(16.29,3.39) 16.38,3.49 16.38,3.83
  TOP w0.254: U1.G10 6.13,14.29 v1(5.8,13.96) ; U1.G10 v1(6.55,13.91) ; U1.G10 U1.F10 ; U1.U16 U1.T16 ; U1.U16 v1(11.5,12.56) ; U1.U16 v1(12.16,12.54) 12.18,12.51 12.2,12.51 ; U1.U16 11.82,12.99 12.08,13.25 ; U1.T16 11.11,12.88 ; U1.T16 11.82,13.59 11.82,13.6 12.16,13.94 ; 8.64,11.81 9.01,11.45 9.01,11.41 9.03,11.41 9.01,11.4 8.99,11.4 8.99,11.39 8.92,11.39 7.93,10.4 ; 8.64,11.81 8.99,12.16 U1.P11 v1(9.34,12.53) ; 8.64,11.81 U1.N10 8.63,12.53 ; 12.08,13.25 12.35,12.97 v1(12.45,12.97) ; 12.08,13.25 v1(11.76,13.57) 12.13,13.94 12.16,13.94 ; U1.AL9 14.38,5.45 v1(14.69,5.76) ; U1.AE12 12.97,8.9 12.92,8.9 v1(12.88,8.94) ; v1(3.31,12.13) 3.37,12.13 U1.G3 ; 12.2,12.51 12.2,12.5 U1.W16 ; 12.2,12.51 11.86,12.18 11.86,12.16 v1(11.84,12.14) 11.83,12.13 11.81,12.13 11.48,11.79 ; 12.2,12.51 12.55,12.87 ; U1.AB17 13.61,11.14 v1(13.56,11.14) ; U1.AB17 13.63,11.77 13.63,11.79 ; U1.AB17 14.27,11.8 v1(14.27,11.88) ; v1(39.22,16.33) 39.09,16.21 UD1.E12 ; U1.AB15 U1.AB14 U1.AD14 ; U1.AB15 13.56,11.09 v1(13.56,11.14) ; U1.AB15 U1.AA15 ; v1(13.96,7.91) 13.63,7.58 U1.AG11 ; U1.J6 5.49,12.17 v1(5.83,11.84) 6.16,11.5 U1.L6 6.16,11.43 v1(6.49,11.1) 6.83,10.76 U1.N6 6.87,10.7 v1(7.19,10.37) ; 11.48,11.79 11.8,11.47 11.8,11.44 ; 11.48,11.79 11.45,11.79 v1(11.43,11.81) 11.43,11.85 11.11,12.17 ; v1(13.24,14.29) v1(12.88,14.65) v1(12.52,15.01) v1(12.88,15.37) ; 17.48,12.88 v1(17.81,12.54) 17.47,12.2 17.47,12.18 ; 17.48,12.88 U1.AE25 ; 17.48,12.88 U1.AE23 ; U1.V18 12.88,13.19 13.23,12.84 ; UD1.C8 35.24,17.51 v1(35,17.75) ; 13.94,16.79 13.92,16.77 U1.P24 ; 13.94,16.79 13.96,16.81 v1(14.02,16.87) 13.94,16.79 ; 13.94,16.79 U1.R24 U1.T24 ; U1.AG6 11.82,5.83 v1(11.48,6.17) ; UD1.P10 36.94,10.36 v1(36.63,10.67) 36.56,10.67 UD1.N9 ; v1(6.55,13.91) 6.55,13.89 ; v1(6.55,13.91) 6.55,13.89 ; U1.Y18 13.27,12.84 13.23,12.84 ; U1.Y18 U1.AA18 ; U1.Y18 13.27,12.21 ; U1.W15 11.8,11.44 ; U1.W15 U1.Y15 ; U1.W15 11.54,12.45 11.54,12.53 v1(11.5,12.56) ; U1.W15 U1.W16 ; 11.8,11.44 v1(11.78,11.43) U1.W13 11.11,10.76 ; U1.W16 12.72,12.36 12.96,12.36 v1(12.98,12.38) ; U1.W16 12.54,12.17 12.91,11.79 ; U1.F12 6.5,15.35 v1(6.15,15.01) 5.81,14.66 U1.F10 ; U1.AG7 U1.AH7 12.31,5.6 v1(12.31,5.36) ; U1.T24 14.65,15.71 14.65,15.6 v1(14.92,15.33) ; U1.T24 14.36,16.06 v1(14.69,16.39) 15,16.08 U1.U25 ; 30.38,15.21 30.07,14.91 UD1.G1 29.46,14.91 v1(29.27,15.1) ; U1.AD11 12.28,8.88 v1(12.28,9.2) ; U1.AD11 12.79,8.9 12.84,8.9 v1(12.88,8.94) ; U1.AD11 12.44,8.55 v1(12.44,8) ; U1.AE21 U1.AE22 ; U1.AE21 16.75,11.49 16.75,11.49 ; U1.AE21 U1.AD21 ; U1.AE21 U1.AE20 ; U1.AE22 U1.AD22 ; U1.AE22 U1.AE23 ; U1.AE22 17.1,11.85 v1(17.11,11.85) ; v1(33.37,9.22) 33.2,9.06 UD1.T5 32.68,9.4 ; U1.AN33 23.5,13.24 23.51,13.24 23.58,13.31 24,13.31 24.02,13.33 v1(24.16,13.33) ; 13.63,11.79 13.63,11.86 U1.AA18 ; 13.63,11.79 13.27,12.15 ; 13.63,11.79 13.56,11.79 U1.AA16 ; U1.Y15 U1.AA15 ; U1.Y15 12.86,11.79 12.91,11.79 ; U1.AJ19 17.44,10.02 17.49,10.02 v1(17.51,10.04) 17.51,10.08 U1.AJ21 17.89,10.4 18.2,10.72 v1(18.2,10.75) 18.24,10.75 18.54,11.05 U1.AJ23 18.86,11.44 v1(18.93,11.44) ; UD1.A3 31.47,18.85 v1(31.47,19.28) ; 8.64,13.23 8.28,12.88 ; 8.64,13.23 U1.N12 ; 8.64,13.23 U1.L12 ; 8.64,13.23 U1.M13 ; 8.28,12.88 8.28,12.88 7.93,13.23 ; 8.28,12.88 8.63,12.53 ; 13.52,18.17 13.54,18.18 v1(13.61,18.18) ; 10.79,14.68 10.43,14.32 v1(10.43,14.25) ; 10.79,14.68 10.79,14.68 U1.N18 U1.N19 ; 10.79,14.68 10.79,14.68 v1(10.42,15.05) ; 12.91,11.79 12.91,11.78 U1.AA16 ; 12.91,11.79 13.27,12.15 ; U1.AA22 15.62,13.32 v1(15.62,13.19) ; U1.AA22 15.62,13.86 v1(15.71,13.86) ; U1.AA22 U1.AA21 15,13.06 v1(15.22,12.83) 15.58,13.19 v1(15.62,13.19) ; U1.AA22 U1.Y22 ; U1.P16 10.74,13.94 v1(10.43,14.25) ; U1.P19 12.16,15.34 v1(12.16,15.37) v1(11.8,15.72) 11.8,15.69 U1.N19 ; U1.P19 U1.N19 ; U1.P19 U1.R19 ; 6.55,13.89 U1.J10 ; 6.55,13.89 6.19,13.53 ; U1.K10 U1.L10 7.93,13.23 ; U1.K10 U1.K9 U1.J9 ; U1.K10 U1.J10 ; U1.K10 7.55,13.57 7.55,13.6 ; v1(34.73,13.56) 34.73,13.71 33.65,14.78 v1(33.58,14.78) 33.45,14.91 UD1.G5 ; v1(2.66,12.83) 2.68,12.81 2.68,12.78 2.93,12.53 U1.E3 ; U1.AC1 8.61,5.45 v1(8.26,5.1) ; 6.19,13.53 6.23,13.53 ; 6.19,13.53 v1(6.15,13.53) 6.15,13.6 v1(5.8,13.96) ; 6.23,13.53 6.52,13.24 U1.J9 ; 6.23,13.53 5.85,13.16 5.82,13.16 v1(5.78,13.12) ; v1(12.45,12.97) 12.55,12.87 ; v1(12.45,12.97) 12.45,12.91 v1(12.98,12.38) ; v1(17.11,11.85) 17.14,11.87 17.14,11.91 17.39,12.16 17.47,12.16 17.47,12.18 ; v1(17.11,11.85) 16.75,11.49 ; v1(5.78,13.12) 5.85,13.12 5.91,13.06 6.34,13.06 U1.J9 ; v1(5.78,13.12) 5.78,13.09 5.75,13.06 5.45,13.06 v1(5.1,13.41) ; v1(11.5,12.56) 11.19,12.88 11.11,12.88 ; v1(11.5,12.56) 11.11,12.17 ; v1(41.08,12.83) 41.08,12.72 40.92,12.56 CD1.2 ; v1(29.31,17.36) 29.35,17.36 29.5,17.51 UD1.C1 v1(30.12,17.21) 30.18,17.16 30.33,17.16 UD1.D2 ; UD1.AB5 33.02,5.13 33.23,4.64 v1(33.25,4.62) ; v1(13.56,11.14) U1.AA16 ; v1(36.67,6.71) 36.62,6.71 UD1.W9 36.28,7.16 36.4,7.16 v1(36.68,7.44) 36.6,7.52 36.6,8.63 v1(36.65,8.69) UD1.T10 37.36,9.39 37.59,9.39 ; 7.56,13.6 7.59,13.6 U1.K12 ; 7.56,13.6 7.55,13.6 ; 7.56,13.6 U1.K11 v1(7.92,13.25) 7.93,13.23 ; U1.AA15 U1.AA16 ; 16.09,15.68 16.41,16.01 U1.W27 ; 16.09,15.68 U1.Y26 ; 16.09,15.68 16.09,15.73 ; U1.AA18 14.23,11.88 v1(14.27,11.88) ; v1(12.88,8.94) 13.23,9.3 U1.AD13 U1.AD14 ; v1(12.88,8.94) 12.62,9.2 v1(12.28,9.2) ; v1(11.1,11.42) v1(10.74,11.06) 10.4,11.06 v1(10.19,10.86) ; 7.55,13.6 7.55,13.61 7.22,13.94 U1.J12 ; U1.Y26 16.42,15.4 16.09,15.73 ; U1.Y26 U1.AA26 ; v1(5.8,13.96) v1(5.44,14.32) 5.48,14.32 U1.F10 ; v1(5.8,13.96) 5.45,13.61 U1.G8 5.28,13.41 v1(5.1,13.41) ; v1(12.6,19.84) 13.12,19.84 U1.J28 13.28,19.95 v1(13.61,19.62) ; v1(31.03,13.85) 31.18,13.85 UD1.J3 ; 11.11,12.88 10.77,12.54 v1(10.77,12.47) ; v1(12.98,12.38) 13.15,12.21 13.27,12.21 ; v1(12.98,12.38) 12.98,12.58 13.23,12.84 ; UD1.W2 30.25,6.73 v1(30.25,6.71) 30.2,6.71 29.95,6.46 UD1.Y1 29.64,6.46 29.45,6.65 v1(29.38,6.65) ; v1(15.71,13.86) v1(16.06,13.51) 16.01,13.46 15.89,13.46 v1(15.62,13.19) ; v1(15.71,13.86) 15.35,14.21 U1.Y23 U1.Y22 ; U1.Y22 U1.W22 14.65,15.06 v1(14.92,15.33) ; v1(31.42,4.67) 31.42,4.68 UD1.AB3 ; 39.29,5.64 39.29,5.79 UD1.Y12 38.28,6.8 v1(38.21,6.8) 37.91,7.11 UD1.W11 ; v1(14.27,11.88) 14.55,12.15 v1(14.71,12.15) ; UD1.V12 39.02,7.76 v1(39.29,7.49) ; UD1.Y5 33.21,6.27 v1(33.53,6.27) ; 16.09,15.73 U1.W27 ; 16.09,15.73 v1(16.09,16.39) ; U1.W27 v1(16.09,16.39) ; U1.J10 U1.J9 ; U1.J10 6.89,13.59 v1(7.23,13.93) ; v1(12.49,21.31) 12.79,21.01 U1.G29 ; v1(12.82,7.66) 12.78,7.66 v1(12.44,8) ; v1(12.28,9.2) 11.96,9.2 U1.AB11 U1.AB10 ; v1(12.28,9.2) 12.28,9.59 U1.AB12 ; 13.27,12.15 13.27,12.21 ; 17.47,12.18 U1.AE23 ; 16.07,10.8 v1(16.37,11.1) 16.37,11.15 ; 16.07,10.8 16.02,10.8 U1.AE19 ; 16.07,10.8 v1(15.69,10.42) U1.AE18 U1.AE19 ; v1(12.05,1.47) 12.17,1.59 U1.AN1 ; 38.11,9.39 38.29,9.39 v1(38.29,9.39) 38.29,9.39 UD1.T12 38.62,9.09 38.94,9.4 v1(39.27,9.4) 39.27,9.47 39.09,9.65 39.09,9.89 UD1.P12 38.31,10.67 v1(38.16,10.67) UD1.N11 38.2,11.38 v1(38.2,11.45) ; v1(9.51,16.82) 9.21,17.12 U1.G18 ; v1(12.44,8) 11.89,8 U1.AD9 U1.AE9 12.44,7.84 v1(12.44,8) ; v1(16.09,16.39) U1.U27 15.71,16.81 v1(15.37,17.14) 15.33,17.14 U1.R27 14.67,17.81 v1(14.67,17.85) 14.63,17.85 14.29,18.18 13.96,18.52 v1(13.96,18.56) ; v1(29.45,16.06) 29.6,16.21 UD1.E1 ; v1(11.14,10.08) v1(11.5,9.72) ; 7.93,14.65 U1.J13 U1.J12 ; 7.93,14.65 U1.J12 ; 7.93,14.65 v1(7.22,15.36) 7.23,15.36 U1.G14 ; U1.L13 U1.L12 ; U1.L13 8.64,13.94 ; U1.L13 8.64,13.94 ; U1.L12 7.93,13.23 ; U1.L12 U1.K12 ; v1(22.13,11.2) 22.04,11.2 22.02,11.23 21.96,11.23 U1.AN28 ; v1(9.04,9.39) 8.73,9.7 U1.U7 U1.R7 ; v1(26.2,15.98) 26.06,16.13 CD18.2 25.61,16.15 CD19.2 ; U1.AD22 16.68,12.79 16.68,12.83 v1(16.73,12.88) 16.73,12.92 U1.AE23 ; U1.AD22 U1.AD21 ; 12.55,12.87 12.55,12.91 U1.V19 ; v1(19.55,14.3) 19.24,14.61 U1.AE29 U1.AC29 ; 8.63,12.53 8.64,12.53 U1.N12 ; v1(37.44,4.77) 37.41,4.77 UD1.AB10 ; UD1.W4 31.85,7.48 v1(31.85,7.97) 31.85,8.12 31.83,8.13 31.83,8.65 UD1.T3 31.82,9.45 31.82,9.49 v1(31.82,9.49) 31.85,9.52 31.85,9.93 31.43,10.36 UD1.P3 ; U1.A1 0.58,13.23 v1(0.2,12.85) ; 11.11,12.17 10.81,12.47 v1(10.77,12.47) ; v1(10.43,14.25) 10.36,14.25 U1.N15 9.7,14.29 U1.M13 ; v1(35.81,17.22) 36.18,16.86 UD1.D9 ; UD1.K4 32.24,12.96 32.44,13.16 32.59,13.16 32.62,13.19 v1(32.65,13.19) ; v1(13.96,18.56) 13.92,18.56 13.61,18.24 v1(13.61,18.18) ; v1(13.96,18.56) v1(14.32,18.92) ; v1(13.96,18.56) 13.63,18.89 U1.L27 12.88,18.89 U1.K26 ; 16.75,11.49 16.42,11.15 16.37,11.15 ; v1(15.39,7.9) 15.06,7.58 U1.AJ13 ; 8.64,13.94 U1.M13 ; v1(29.5,8.73) UD1.T1 ; U1.AK5 12.54,4.39 v1(12.87,4.72) ; U1.J12 U1.K12 ; 12.91,16.9 12.53,16.52 U1.N22 ; U1.T18 12.16,13.94 ; U1.AD21 U1.AD20 U1.AE20 ; UD1.G8 35.76,15.24 v1(35.81,15.24) ; v1(12.15,11.05) v1(12.51,10.69) ; U1.AE20 U1.AE19 ; U1.AE20 16.37,11.15 ; 13.56,6.84 v1(13.61,6.84) 13.28,6.52 U1.AH9 ; v1(17.89,16.78) 18.18,16.49 U1.AA30 ; UD1.V8 35.14,7.76 v1(34.98,7.59) ; UD1.K2 30.51,13.07 30.36,13.07 v1(30.27,13.16) ; v1(35.8,8.68) UD1.T8 ; v1(13.61,18.18) 13.94,17.85 U1.N26 U1.N27 ; v1(29.29,7.76) UD1.V1 ; v1(31.02,15.18) 31.29,14.91 UD1.G3 ; v1(14.92,15.33) 14.92,15.33 v1(15.28,15.69) ; v1(5.1,13.41) 5.1,13.94 U1.F8 ; v1(5.1,13.41) 5.1,13.4 4.57,13.4 U1.F6 ; v1(33.45,17.77) 33.29,17.77 UD1.C5 32.74,17.22 32.61,17.22 v1(32.59,17.2) 32.56,17.2 UD1.D4 31.88,16.51 v1(31.83,16.51) ; v1(35.18,4.72) 35.42,4.97 UD1.AB8 ; 38.26,14.64 38.22,14.59 ; 38.26,14.64 38.53,14.91 UD1.G12 39.03,14.91 v1(39.1,14.84) ; 38.26,14.64 v1(38.22,14.64) ; v1(30.26,10.88) 30.38,11.01 UD1.N2 ; v1(11.78,3.66) 12.11,3.33 U1.AL3 ; U1.AE25 18.12,12.94 18.21,12.94 v1(18.21,12.83) ; U1.AE25 U1.AE26 18.32,13.45 18.32,12.95 v1(18.21,12.83) ; U1.N30 15.35,19.32 v1(15.04,19.63) 14.72,19.95 U1.L30 ; UD1.J12 38.62,13.61 38.26,13.24 v1(38.26,13.19) 38.25,13.19 38.24,13.18 38.2,13.18 37.98,12.96 UD1.K11 37.67,12.96 UD1.J10 36.72,13.3 v1(36.66,13.3) 36.6,13.23 36.5,13.23 UD1.K9 ; U1.AN24 20.3,10.02 20.7,9.63 v1(20.7,9.42) ; U1.AM5 v1(13.23,4.34) ; v1(33.55,7.96) 33.54,7.95 33.53,7.95 33.33,7.76 UD1.V5 ; 16.28,21.05 16.24,21.01 U1.L33 ; U1.AG3 10.68,4.75 v1(10.38,5.04) ; v1(17.16,17.51) 17.16,17.44 17.79,16.8 17.85,16.8 17.87,16.78 ; U1.N12 v1(9.34,12.53) ; U1.AG28 19.6,13.43 v1(19.79,13.24) 19.6,13.04 U1.AH27 19.52,12.96 18.97,12.96 U1.AG25 18.23,12.83 v1(18.21,12.83) ; 37.62,14.59 37.47,14.59 v1(37.44,14.63) 37.16,14.91 UD1.G10 36.62,15.31 36.62,15.74 36.65,15.77 36.65,15.82 v1(36.65,15.82) ; v1(34.85,16.21) UD1.E8 ; v1(6.47,19.91) 6.56,19.82 6.66,19.82 ; v1(9.71,12.14) 9.67,12.14 U1.R11 9.01,11.49 v1(9.01,11.4) ; v1(10.77,12.47) 10.72,12.53 U1.R13 9.7,12.17 v1(9.34,12.53) ; UD1.N4 32.49,10.74 32.61,10.74 32.62,10.73 v1(32.63,10.73) ; UD1.A10 37.07,18.81 v1(37.4,18.48) ; U1.AE14 U1.AD14 ; U1.AL14 U1.AL13 U1.AL12 v1(15.04,6.83) 14.72,6.52 U1.AK11 ; v1(35.13,6.75) UD1.Y8 ; v1(39.04,17.83) 38.95,17.83 UD1.C12 38.38,17.26 38.29,17.26 v1(38.25,17.22) 38.19,17.22 UD1.D11 ; v1(33.49,16.67) UD1.E5
  TOP w0.305: 24.31,1.55 23.92,1.55
  TOP w0.381: CD13.2 24.11,15.04 23.7,15.45 v1(23.25,15.45)
  L2GND w0.076: 36.98,10.41 37.01,10.39 37.64,10.39 37.67,10.41 ; 38.4,4.55 38.4,4.52 38.66,4.27 ; 32.89,14.22 32.36,14.22 ; 31.39,16.87 31.39,16.86 30.86,16.86 30.83,16.84 ; 37.69,7.04 37.58,7.04 37.57,7.02 37.31,7.02 37.3,7.04 37.01,7.04 ; 36.85,16.89 36.81,16.89 36.78,16.87 36.52,16.87 36.5,16.89 36.4,16.89
  L3 w0.254: v1(19.88,19.37) 17.89,17.38 v1(17.89,16.78) ; v1(38.12,23.55) 38.1,23.57 v1(35.33,23.57) v1(31.67,23.57) v1(28.5,23.57) v1(25.53,23.57) 23.9,23.57 v1(23.42,23.09) 21.03,20.7 v1(21.03,20.57)
  BOTTOM w0.254: v1(38.2,11.45) 38.33,11.59 CD6.2 38.33,12.31 v1(38.25,12.39) ; CD8.2 31.34,19.4 v1(31.47,19.28) ; v1(23.42,23.09) 23.42,22.96 v1(21.03,20.57) 19.88,19.42 v1(19.88,19.37) 19.14,18.63 18.94,18.63 ; CD3.2 39.59,5.56 v1(39.29,5.26) ; 17.42,9.25 16.25,10.42 v1(15.69,10.42) ; CD11.2 29.44,7.91 v1(29.29,7.76) ; CD5.2 35.64,17.04 v1(35.81,17.22) ; v1(29.27,15.1) 29.26,15.09 CD12.2 ; v1(31.02,15.18) 30.88,15.04 CD20.2 ; CD7.2 33.63,9.48 v1(33.37,9.22) ; CD9.2 33.55,17.67 v1(33.45,17.77) ; CD4.2 33.36,4.74 v1(33.25,4.62)
  BOTTOM w0.305: v1(29.45,16.06) CD10.2
  vias: v1(6.11,12.17) v1(12.88,11.76) v1(13.59,11.77) v1(17.53,8.6) v1(20.17,2.06) v1(21.49,0.89) v1(21.67,2.34) v1(22.22,3.45) v1(22.53,1.22) v1(23.26,2.41) v1(23.34,24.49) v1(23.77,0.99) v1(24.92,1.57) v1(25.34,24.2) v1(26,18.38) v1(26.11,1.42) v1(27.23,0.96) v1(27.89,1.47) v1(28.74,10.84) v1(29.9,0.84) v1(30.38,1.32) v1(30.65,0.83) v1(31.56,24.3) v1(32.43,1.07) v1(32.43,0.53) v1(35.48,3.28) v1(35.68,1.29) v1(36.55,1.45) v1(36.82,1.9) v1(37.08,3.48) v1(38.14,24.34) v1(38.89,4.78) v1(39.27,10.44) v1(40.28,23.09) v1(40.26,1.83) v1(41.11,11.25) v1(41.18,10.21) v1(41.25,16.1) v1(41.29,13.94) v1(41.31,8.57) v1(41.37,21.21) v1(41.43,7.52) v1(41.48,24.43) v1(41.68,18.93)
VCC-DRAM: length 63.8
  TOP w0.203: U1.AC24 v1(17.09,13.91)
  TOP w0.254: 16.04,15.02 16.37,14.69 v1(16.37,14.63) ; 16.04,15.02 16.04,14.98 U1.Y24 ; 16.04,15.02 U1.W25 U1.W24 ; U1.AC19 15.05,11.82 v1(15.37,11.5) 15.33,11.5 v1(14.99,11.16) ; U1.AC19 U1.AC18 ; U1.AC19 U1.AC20 15.67,12.49 v1(15.67,12.53) 15.71,12.53 U1.AC22 U1.AC24 ; U1.AA24 16.06,14.32 v1(16.37,14.63) ; U1.AA24 U1.Y24 ; U1.AA24 U1.AB24 ; v1(17.16,13.19) U1.AC24 ; U1.AC24 U1.AB24 ; v1(14.99,11.16) 14.64,10.81 v1(14.64,10.8) 14.58,10.8 14.29,11.09 U1.AC17 U1.AC18 ; v1(14.99,11.16) 14.95,11.16 U1.AC18 ; U1.AB24 16.73,14.26 v1(16.73,14.27) ; UD1.B10 37.09,18.16 v1(37.39,17.86) ; v1(16.73,14.27) v1(17.09,13.91) ; v1(16.73,14.27) v1(16.37,14.63) ; v1(16.73,14.27) 17.27,14.8 v1(17.32,14.8) ; v1(34.14,9.17) 33.6,9.71 UD1.R5 ; v1(35.05,17.04) 35.24,16.86 UD1.D8 ; UD1.W1 29.13,7.11 28.83,6.8 v1(28.83,6.65) ; UD1.H1 29.02,14.26 28.42,14.86 v1(28.42,15.09) 28.28,14.95 RD1.2 27.71,15.04 CD13.1 ; v1(37.45,5.42) 37.07,5.81 UD1.AA10 ; UD1.AB4 32.22,5 v1(31.98,4.75) ; v1(29.31,13.11) 29.46,12.96 UD1.K1 ; UD1.AA8 35.05,5.81 v1(35.01,5.85) ; UD1.AB9 36.22,4.71 v1(36.18,4.67) ; UD1.D5 33.02,16.88 33.32,17.18 v1(33.45,17.18) ; v1(34.87,15.37) 34.84,15.4 34.36,15.4 v1(34.19,15.57) 34.17,15.56 UD1.F5 ; v1(34.87,15.37) 34.92,15.32 v1(34.92,14.38) 35.04,14.26 UD1.H8 ; v1(34.87,15.37) 35.02,15.31 35.38,15.46 UD1.F8 ; UD1.F3 31.78,15.21 31.79,15.21 v1(31.79,15.2) ; v1(32.22,19.31) 32.22,19.3 UD1.A4 ; v1(29.28,10.82) 29.47,11.01 UD1.N1 ; U1.W24 U1.W23 ; U1.W24 U1.Y24 ; UD1.U5 33.28,8.41 33.55,8.68 v1(33.55,8.69) ; v1(36.35,19.33) 36.22,19.21 UD1.A9 ; v1(39.02,13.97) 39.02,13.24 v1(38.96,13.18) 38.85,13.18 UD1.K12 ; v1(39.02,13.97) 39.03,13.98 CD1.1 ; v1(39.02,13.97) 38.92,13.97 UD1.H12 ; v1(33.6,6.86) 33.27,6.86 UD1.W5 ; UD1.R1 28.88,9.71 v1(28.7,9.52) 28.33,9.15 RD2.2 ; v1(31.85,5.54) 31.58,5.81 UD1.AA3 ; UD1.B8 35.08,18.16 v1(34.95,18.28) ; v1(31.06,8.03) 31.42,8.39 UD1.U3 ; v1(37.42,8.12) 37.42,8.15 37.17,8.41 UD1.U10 ; UD1.R12 v1(38.3,10.03) ; v1(32.64,13.89) 33,14.26 UD1.H5 ; UD1.U8 34.98,8.86 v1(34.98,9.25) 35.42,9.69 UD1.R8 ; UD1.N12 38.62,11.12 v1(38.88,11.38) ; v1(33.58,5.66) 33.43,5.81 UD1.AA5 ; CD2.1 39.06,6.81 v1(39.06,6.81) 38.76,7.11 UD1.W12 ; v1(35.87,6.78) 35.81,6.78 35.49,7.11 UD1.W8 ; UD1.K3 31.19,12.96 v1(31.04,13.11) ; UD1.B3 v1(31.77,17.81) ; UD1.D12 38.8,16.86 v1(39.06,17.12) ; UD1.N3 31.32,11.01 v1(31.03,10.72) ; UD1.F10 37.15,15.56 v1(37.43,15.83) ; UD1.D1 v1(29.33,16.86) ; UD1.K10 37.02,12.78 v1(37.39,12.42) 37.51,12.29 37.51,11.58 v1(37.39,11.45) 37.02,11.09 UD1.N10 ; UD1.B5 v1(33.33,18.46)
  BOTTOM w0.076: 30.83,16.87 30.97,16.87 30.97,16.86 31.23,16.86 31.23,16.87 31.34,16.87 ; 36.83,16.18 36.24,16.18 ; 33.63,16.33 33.22,16.33 ; 37.61,7.01 37.11,7.01 ; 38.1,7.82 38.53,7.82 ; 37.61,14.3 37.26,14.3 ; 36.83,16.87 36.34,16.87 ; 32.76,16.84 32.38,16.84 ; 38.58,7.14 38.56,7.12 38.06,7.12 38.05,7.14
  BOTTOM w0.254: v1(31.06,8.03) 30.94,7.91 CD11.1 ; v1(33.45,17.18) 33.76,17.18 CD9.1 ; v1(37.39,11.45) 37.52,11.59 37.52,11.89 CD6.1 37.5,11.95 37.5,12.31 v1(37.39,12.42) ; CD5.1 35.31,15.8 v1(34.87,15.37) ; v1(33.33,18.46) 33.54,18.67 RD3.2 ; CD4.1 32.29,5.06 v1(31.98,4.75) ; 19.46,17.76 19.15,18.07 RD5.2 ; v1(34.98,9.25) 34.48,9.74 CD7.1 ; CD12.1 28.41,15.08 v1(28.42,15.09) ; v1(39.06,6.81) 39.15,6.72 CD3.1 ; v1(29.33,16.86) 29.28,16.91 CD10.1 ; RD4.2 35.3,18.28 v1(34.95,18.28)
  vias: v1(19.79,7.71)
VDD18-DRAM: length 36.9
  TOP w0.254: v1(17.8,13.88) 17.77,13.88 17.48,13.59 ; CD19.1 24.76,16.15 CD18.1 24.23,16.13 v1(24.18,16.18)
  TOP w0.305: v1(38.73,20.12) 39.57,20.12 40.6,19.09 v1(40.6,17.37) ; v1(28.07,17.98) 29.31,19.22 30.27,19.22 v1(30.45,19.41)
  L3 w0.305: v1(28.07,17.98) 28.07,17.05 27.81,16.79 25.5,16.79 25.13,16.42 24.42,16.42 v1(24.18,16.18) 23.95,15.95 23.04,15.95 22.65,15.57 21.56,15.57 19.75,13.75 19.58,13.75 19.02,13.19 18.47,13.19 17.8,13.86 v1(17.8,13.88) ; v1(30.45,19.41) 30.45,19.42 30.83,19.79 33.24,19.79 33.73,19.3 34.87,19.3 35.33,19.76 35.94,19.76 37.01,20.83 38.02,20.83 v1(38.73,20.12)
  BOTTOM w0.305: v1(40.6,17.37) RD6.1
VDD18-LPDDR: length 33.4
  TOP w0.102: v1(36.57,9.4) UD1.T9
  TOP w0.254: v1(35.84,14.52) UD1.G9 ; v1(30.2,15.98) 30.2,15.92 29.83,15.56 UD1.F1 ; v1(32.64,8.64) 32.64,8.64 UD1.T4 ; v1(32.65,15.33) 32.65,15.23 32.33,14.91 UD1.G4 ; v1(38.93,8.71) UD1.U12 ; UD1.F12 v1(39.16,15.56)
  TOP w0.305: UD1.U1 30.14,8.72 v1(30.21,8.72)
  L3 w0.254: v1(30.21,8.72) 32.55,8.72 v1(32.64,8.64)
  L3 w0.305: v1(39.09,12.52) 39.16,12.52 39.57,12.93 39.57,15.18 39.19,15.56 v1(39.16,15.56) 38.95,15.34 36.65,15.34 35.84,14.53 v1(35.84,14.52) 35.51,14.86 34.2,14.86 33.64,15.42 32.74,15.42 v1(32.65,15.33) 32.65,15.5 32.1,16.05 30.28,16.05 v1(30.2,15.98) ; v1(32.64,8.64) 32.64,9.1 33.29,9.75 36.22,9.75 v1(36.57,9.4) 37.54,9.4 38.22,8.72 38.58,8.72 v1(38.93,8.71) 38.81,8.84 38.81,10.63 39.13,10.95 v1(39.19,10.95)
  BOTTOM w0.254: v1(30.2,15.98) 29.87,15.65 CD20.1
  BOTTOM w0.305: v1(39.09,12.52) 39.34,12.52 RD6.2 39.75,11.14 CD21.1 39.55,10.95 v1(39.19,10.95)
Net_382: length 7
  TOP w0.076: 19.62,6.2 19.51,6.31 19.21,6.31 18.94,6.57 18.94,6.98 18.25,7.68 18.08,7.68 17.93,7.83 17.93,7.92 17.83,8.28
  TOP w0.102: 19.62,6.2 19.62,6.17 20.32,5.47 20.32,4.85 21.95,3.22
Net_386: length 6.4
  TOP w0.076: 17.83,7.58 18.6,6.8 18.6,6.48 18.91,6.17 18.91,5.87 19.15,5.62 19.49,5.62 19.91,5.21 19.91,5.15
  TOP w0.114: 19.91,5.15 19.91,4.68 21.64,2.95
SAA0: length 9.3
  TOP w0.076: 23.57,15.09 22.52,15.09 U1.AJ33
  TOP w0.114: 23.57,15.09 24.19,14.46 28.19,14.46 28.67,13.99 30.04,13.99 30.31,14.26 UD1.H2
SAA1: length 9.8
  TOP w0.076: U1.AJ32 22.07,14.29 22.51,14.73 23.47,14.73
  TOP w0.114: 23.47,14.73 24.1,14.1 28.04,14.1 28.65,13.49 29.54,13.49 29.69,13.34 29.94,13.34 30.19,13.59 30.2,13.59 30.22,13.61 UD1.J2
SAA2: length 18.5
  TOP w0.102: v1(21.04,14.34) 20.99,14.29 U1.AG30 ; UD1.H9 v1(36.62,14.66)
  L3 w0.114: v1(21.04,14.34) 21.08,14.34 21.75,15.01 24.18,15.01 24.72,15.55 31.33,15.55 31.33,15.56 31.91,15.56 32.19,15.28 32.19,15.14 32.45,14.88 32.94,14.88 33.52,14.31 33.53,14.31 33.74,14.09 33.74,14.09 33.87,13.95 35.92,13.95 36.03,14.06 36.03,14.06 36.31,14.33 36.31,14.34 v1(36.62,14.66)
SAA3: length 18.9
  TOP w0.102: U1.AG29 19.99,13.9 20.65,13.9 v1(20.7,13.95)
  TOP w0.114: UD1.H10 36.74,13.97 v1(36.69,13.97)
  L3 w0.114: v1(36.69,13.97) 36.69,13.92 36.38,13.61 35.5,12.73 26.54,12.73 24.58,14.69 21.92,14.69 21.13,13.9 20.77,13.9 20.71,13.95 v1(20.7,13.95)
SAA4: length 19.1
  TOP w0.102: UD1.H11 v1(37.5,13.93)
  TOP w0.114: U1.AJ30 v1(21.34,13.26)
  L3 w0.076: 24.79,13.95 21.61,13.95 21.34,13.68
  L3 w0.114: 24.79,13.95 26.38,12.36 36.25,12.36 37.5,13.61 v1(37.5,13.93) ; 21.34,13.68 v1(21.34,13.26)
SAA5: length 19.1
  TOP w0.114: UD1.J11 38.14,13.92 v1(38.25,13.92) ; v1(21.74,13.62) 21.69,13.62 U1.AJ31
  L3 w0.076: v1(21.74,13.62) 21.79,13.66 24.46,13.66
  L3 w0.114: v1(38.25,13.92) 38.25,13.84 36.41,11.99 26.13,11.99 24.46,13.66
SAB0: length 13
  TOP w0.114: UD1.R2 30.36,9.97 28.52,9.97 28.24,9.7 v1(27.05,9.7) ; v1(19.54,12.17) 19.24,11.87 U1.AJ25
  L3 w0.076: v1(19.54,12.17) 20.29,12.17 21.06,11.4 21.44,11.4 21.96,10.88 22.79,10.88 22.81,10.9 23.73,10.9
  L3 w0.114: 23.73,10.9 24.91,9.72 25.83,9.72 26.08,9.47 26.82,9.47 v1(27.05,9.7)
SAB1: length 13.5
  TOP w0.114: U1.AH25 18.89,12.27 v1(19.17,12.55) ; v1(26.32,9.84) 26.37,9.84 26.64,10.11 27.33,10.11 27.74,10.52 28.44,10.52 28.48,10.48 29.53,10.48 29.67,10.62 30.01,10.62 30.28,10.36 UD1.P2
  L3 w0.076: 23.56,11.59 21.09,11.59 20.34,12.34 19.99,12.34 19.78,12.55 v1(19.17,12.55)
  L3 w0.114: 23.56,11.59 25.05,10.1 26.05,10.1 26.3,9.84 v1(26.32,9.84)
SAB2: length 19.3
  TOP w0.102: UD1.R9 35.94,9.42 v1(35.84,9.32)
  TOP w0.114: U1.AL25 v1(20.28,11.44)
  L3 w0.076: 23.07,10.52 21.82,10.52 21.47,10.86 20.86,10.86 v1(20.28,11.44)
  L3 w0.114: 23.07,10.52 25.91,7.67 28.72,7.67 29,7.39 29.91,7.39 30.11,7.59 34.47,7.59 35.13,8.25 35.13,8.61 v1(35.84,9.32)
SAB3: length 20.7
  TOP w0.114: v1(34.6,8.29) 34.6,9.56 35.02,9.97 36.76,9.97 UD1.R10 ; U1.AK25 19.6,11.51 v1(19.9,11.82)
  L3 w0.076: 23.39,10.69 21.89,10.69 21.38,11.2 21.01,11.2 20.4,11.82 v1(19.9,11.82)
  L3 w0.114: 23.39,10.69 23.41,10.69 25.84,8.27 30.79,8.27 30.89,8.36 31.96,8.36 32.02,8.3 33.37,8.3 33.38,8.32 34.58,8.32 v1(34.6,8.29)
SAB4: length 20.5
  TOP w0.102: v1(37.41,10.06) 37.47,10.06 UD1.R11 ; v1(20.29,12.81) 20.27,12.79 20.22,12.79 U1.AJ27
  L3 w0.076: v1(20.29,12.81) 20.79,12.81 21.48,12.12
  L3 w0.114: 21.48,12.12 22.61,12.12 23,12.5 23.74,12.5 25.37,10.87 28.02,10.87 28.55,10.34 31.51,10.34 31.63,10.23 32.02,10.23 32.28,10.49 32.28,10.86 32.49,11.07 35.67,11.07 36.67,10.06 v1(37.41,10.06)
SAB5: length 17.9
  TOP w0.102: v1(37.45,10.74) UD1.P11
  TOP w0.114: U1.AL29 v1(21.7,12.87)
  L3 w0.114: v1(37.45,10.74) 36.57,11.61 25.7,11.61 24.44,12.88 24.12,12.88 23.84,13.16 22,13.16 v1(21.7,12.87)
SCKE0-A: length 10.9
  TOP w0.076: U1.AM31 22.53,12.78 22.88,12.78 23.03,12.63 23.03,12.63 23.23,12.44 23.76,12.44
  TOP w0.114: v1(28.22,13.13) 28,12.91 26.66,12.91 26.04,12.29 23.9,12.29 23.76,12.44 ; UD1.J4 32.22,13.6 31.86,13.24 v1(31.86,13.19)
  L3 w0.114: v1(28.22,13.13) 28.6,13.51 31.22,13.51 31.54,13.19 v1(31.86,13.19)
